# Allegro board max86141_spo2_1mm_apps_p3.brd
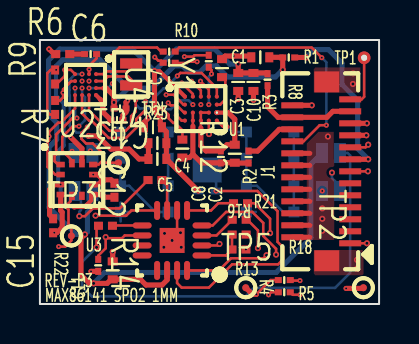
[diagram p0: board, top side]
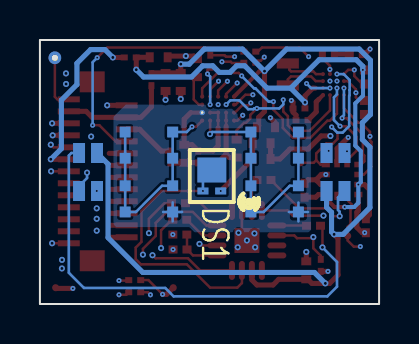
[diagram p1: board, bottom side, seen from below]

Outline 16.99 x 13.21 mm; copper layers: TOP, L02_GND, L03_SIG, BOTTOM. Coordinates in mm from the lower left corner of the outline.
Outline path: rectangle 0,0 16.99,13.21

## Design rules (mm)
constraint set DEFAULT: min track width 0.127

## Placement (name value [footprint] x y rotation side)
C1  22UF  [0402]  11.04 12.34 0 top
C2  22UF  [0402]  9.76 7.52 270 top
C3  22UF  [0402]  9.94 11.11 90 top
C4  22UF  [0402]  5.89 7.26 0 top
C5  22UF  [0402]  5.89 8.05 0 top
C6  1UF  [CAPC0603X33M]  2.54 12.5 0 top
C7  10UF  [0402]  9.13 11.8 270 top
C8  1UF  [CAPC0603X33M]  9.06 7.36 270 top
C9  1UF  [CAPC0603X33M]  3.86 9.2 180 top
C10  22UF  [0402]  10.7 11.11 90 top
C11  22UF  [0402]  3.65 1.68 270 top
C12  0.1UF  [CAPC0603X33M#2]  3.73 5.69 270 top
C13  1UF  [CAPC0603X33M]  4.01 9.78 180 top
C15  0.1UF  [CAPC0603X33M#2]  0.66 3.91 90 top
DS1  CT DBLP31.12-5C8C-56-J6Q6  [OSRM_CT-DBLP31_12-1]  8.38 6.4 0 bottom
DS2  SFH 7013  [LED_SFH7013]  2.18 6.6 180 bottom
DS3  SFH 7013  [LED_SFH7013]  14.58 6.6 0 bottom
J1  5016162575  [MOLEX_501616-2575]  14.05 6.64 90 top
NOREF  -  []  12.7 -12.7 0 top
NOREF#2  -  []  8.38 64.01 0 top
NOREF#3  -  []  184.71 31.64 0 top
NOREF#4  -  []  0 0 90 top
NOREF#5  -  []  0 13.21 0 top
PD1  VEMD8080  [EK_DIO_VEMD8080]  11.53 6.6 0 bottom
PD2  VEMD8080  [EK_DIO_VEMD8080]  5.23 6.6 0 bottom
R1  0  [RESC0603X33M#2]  12.47 12.33 0 top
R2  0  [RESC0603X33M#2]  10.46 7.35 270 top
R3  0  [RESC0603X33M#2]  11.41 11.22 90 top
R4  0  [RESC0603X33M#2]  12.24 1.2 0 top
R5  0  [RESC0603X33M#2]  12.24 0.59 0 top
R6  10  [RESC0603X33M]  1.14 12.5 0 top
R7  3.3K  [RESC0603X33M]  0.76 9.83 270 top
R8  OPEN  [RESC0603X23L]  8.46 12.14 270 top
R9  3.3K  [RESC0603X33M]  0.76 11.36 90 top
R10  0  [RESC0603X33M#2]  6.48 12.07 0 top
R11  0  [RESC0603X33M#2]  6.48 12.63 180 top
R12  100K  [RESC1005X50L]  7.14 7.78 270 top
R13  0  [RESC0603X33M]  9.98 3.47 180 top
R14  OPEN  [RESC0603X23L]  2.92 1.93 270 top
R16  0  [RESC0603X33M]  9.98 4.22 180 top
R17  0  [RESC0603X33M]  5.77 6.2 0 top
R18  0  [RESC0603X33M]  9.97 2.73 180 top
R21  0  [RESC0603X33M]  10.05 5.04 180 top
R22  0  [RESC0603X33M]  3.28 3.92 0 top
R23  100K  [RESC1005X50L]  5.66 8.84 0 top
S1  -  [INTENTIONAL_SHORT_2PIN]  8.86 9.57 180 bottom
TP1  N/A  [TP_C25H12]  16.24 12.32 0 top
TP2  TP14PAD  [TP_CIR_0-3556]  16.21 0.82 0 top
TP3  TP14PAD  [TP_CIR_0-3556]  1.57 3.41 0 top
TP4  TP14PAD  [TP_CIR_0-3556]  3.94 7.06 0 top
TP5  TP14PAD  [TP_CIR_0-3556]  10.31 0.82 0 top
U1  MAX86141  [BGA20C40P5X4_204X184X50B27M]  8.06 9.77 0 top
U2  KX122-1037  [KNX_LGA12P]  1.85 6.23 0 top
U3  MAX4740ETE+  [QFN50P300X300X80-17M]  6.62 3.18 180 top
U4  MAX32664GWEZ+  [MAXIM_21-100241]  2.29 10.98 270 top
Y1  32.7680KHZ  [XTALDFN160X100X50-2M]  4.57 11.48 270 top

## Library data of the parts
C1-C5 C10 C11 = CAP_NP: alternate symbols: 0402_NOSILK,CAPC1005X50L,CAP0402-NOT_FOR_TEST; part number: CAP_NP_0402CAP-0402,22UF,20-0022U-BA80
C6 C9 C13 = CAP_NP: alternate symbols: 0201_NOSILK,CAPC0603X23L,CAP0201-NOT_FOR_TEST; part number: CAP_NP_0201CAPM-CAPC0603X33M,1UF,20-0001U-EA78
C7 = CAP_NP: alternate symbols: 0402_NOSILK,CAPC1005X50L,CAP0402-NOT_FOR_TEST; part number: CAP_NP_0402CAP-0402,10UF,20-0010U-BA12
C8 = CAP_NP: alternate symbols: 0201_NOSILK,CAPC0603X23L,CAP0201-NOT_FOR_TEST; part number: CAP_NP_0201CAPM-CAPC0603X33M,1UF,20-0001U-AA20
C12 C15 = CAP_NP: alternate symbols: 0201_NOSILK,CAPC0603X23L,CAPC0603X33M_NOSILK_RF; part number: CAP_NP_0201CAPM-CAPC0603X33M,0.1UF,20-000U1-BA99
DS1 = LED_3P: part number: LED_3P_LED_CT-DBLP31_12-OSRM_CT-DBLP31_12-1,CT DBLP31.12-5C8C-56-J6Q6,30-CTDBLP31125C8C56J6Q6-00
DS2 DS3 = LED_4P: part number: LED_4P_SFH7013-LED_SFH7013,SFH 7013,30-SFH7013-00
J1 = 501616-2575: part number: 501616-2575_RA-MOLEX_501616-2575,5016162575,01-501616257525P-29
PD1 PD2 = EK_DIO_PIN_8P: part number: EK_DIO_PIN_8P_SMD-EK_DIO_VEMD8080,VEMD8080,N/A
R1-R5 R10 R11 R13 R16-R18 R21 R22 = RES: alternate symbols: 0201_NOSILK,RESC0603X23L; part number: RES_0201RES-RESC0603X33M,0,80-0000R-95
R6 = RES: alternate symbols: (0201_NOSILK); part number: RES_0201RES-RESC0603X33M,10,80-0010R-95
R7 R9 = RES: alternate symbols: (0201_NOSILK); part number: RES_0201RES-RESC0603X33M,3.3K,80-003K3-95
R8 R14 = EK_RES_SMD: part number: EK_RES_SMD_0201_FF-RESC0603X23L,OPEN,N/A
R12 R23 = EK_RES_SMD: part number: EK_RES_SMD_0402_FF-RESC1005X50L,100K,80-0100K-23
S1 = INTENTIONAL_SHORTS: alternate symbols: INTENTIONAL_SHORT_2PIN_C170H110;INTENTIONAL_SHORT_2PIN_C0508H0203;INTENTIONAL_SHORT_2PIN_C0635H03048;INTENTIONAL_SHORT_2PIN_MB_START_LAYER;INTENTIONAL_SHORT_2PIN_C0635H03048_M0;INTENTIONAL_SHORT_2PIN_C0508H0203_M0;INTENTIONAL_SHORT_2PIN_V16H6; part number: INTENTIONAL_SHORTS_PAD_2-INTENTIONAL_SHORT_2PIN,INTENTIONAL_SHORT_2PIN,N/A
TP1 = TP: part number: TP_TP-TP_C25H12,N/A,N/A
TP2-TP5 = EVKIT_TP: part number: EVKIT_TP_EVKIT_TP-TP_CIR_0-3556,TP14PAD,N/A
U1 = EK_MAX86141: alternate symbols: BGA20C40P5X4_204X184X50B27L; part number: EK_MAX86141_WLP-20-BGA20C40P5X4_204X184X50B27M,MAX86141,N/A
U2 = KX122-1037: part number: KX122-1037_LGA12-KNX_LGA12P,KX122-1037,10-KX1221037-L
U3 = MAX4740: part number: MAX4740_TQFN16-EP-QFN50P300X300X80-17M,MAX4740ETE+,10-MAX4740ETE-T
U4 = EK_MAX32664: alternate symbols: BGA16C35P4X4_157X155X69L; part number: EK_MAX32664_WLP16_VER_B-C-MAXIM_21-100241,MAX32664GWEZ+,N/A
Y1 = XTAL: part number: XTAL_XTALDFN160X100X50-2M-XTALDFN160X100X50-2M,32.7680KHZ,60-32K76-0ET

## Footprints (pads in the part's own frame, mm; a bottom-side part is the same pattern mirrored in y, then rotated)
0402
  rect 0.4x0.5 smd: 1(-0.45,0) 2(0.45,0)
BGA20C40P5X4_204X184X50B27M
  round 0.21 smd: A1(-0.8,0.6) A2(-0.4,0.6) A3(0,0.6) A4(0.4,0.6) A5(0.8,0.6) B1(-0.8,0.2) B2(-0.4,0.2) B3(0,0.2) B4(0.4,0.2) B5(0.8,0.2) C1(-0.8,-0.2) C2(-0.4,-0.2) C3(0,-0.2) C4(0.4,-0.2) C5(0.8,-0.2) D1(-0.8,-0.6) D2(-0.4,-0.6) D3(0,-0.6) D4(0.4,-0.6) D5(0.8,-0.6)
CAPC0603X33M
  rect 0.35x0.3 smd: 1(-0.3,0) 2(0.3,0)
CAPC0603X33M#2
  rect 0.45x0.4 smd: 1(-0.35,0) 2(0.35,0)
EK_DIO_VEMD8080
  rect 0.55x0.54 smd: 1(-1.19,-2) 2(-1.19,-0.69) 3(-1.19,0.69) 4(-1.19,2) 5(1.19,2) 6(1.19,0.69) 7(1.19,-0.69) 8(1.19,-2)
INTENTIONAL_SHORT_2PIN
  round 0.254 hole 0.102: 1(0,0) 2(0,0)
KNX_LGA12P
  rect 0.41x0.28 smd: 1(-0.815,0.75) 2(-0.815,0.25) 3(-0.815,-0.25) 4(-0.815,-0.75) 7(0.815,-0.75) 8(0.815,-0.25) 9(0.815,0.25) 10(0.815,0.75)
  rect 0.28x0.41 smd: 5(-0.25,-0.815) 6(0.25,-0.815) 11(0.25,0.815) 12(-0.25,0.815)
LED_SFH7013
  rect 0.6x1 smd: 1(-0.45,0.95) 2(0.45,0.95) 3(-0.45,-0.95) 4(0.45,-0.95)
MAXIM_21-100241
  round 0.2 smd: A1(-0.525,0.525) A2(-0.175,0.525) A3(0.175,0.525) A4(0.525,0.525) B1(-0.525,0.175) B2(-0.175,0.175) B3(0.175,0.175) B4(0.525,0.175) C1(-0.525,-0.175) C2(-0.175,-0.175) C3(0.175,-0.175) C4(0.525,-0.175) D1(-0.525,-0.525) D2(-0.175,-0.525) D3(0.175,-0.525) D4(0.525,-0.525)
MOLEX_501616-2575
  rect 0.3x1.1 smd: 1(-3.6,-1.5) 2(-3.3,1.4) 3(-3,-1.5) 4(-2.7,1.4) 5(-2.4,-1.5) 6(-2.1,1.4) 7(-1.8,-1.5) 8(-1.5,1.4) 9(-1.2,-1.5) 10(-0.9,1.4) 11(-0.6,-1.5) 12(-0.3,1.4) 13(0,-1.5) 14(0.3,1.4) 15(0.6,-1.5) 16(0.9,1.4) 17(1.2,-1.5) 18(1.5,1.4) 19(1.8,-1.5) 20(2.1,1.4) 21(2.4,-1.5) 22(2.7,1.4) 23(3,-1.5) 24(3.3,1.4) 25(3.6,-1.5)
  rect 1.05x1.25 smd: 26(-4.475,-0.325) 27(4.475,-0.325)
OSRM_CT-DBLP31_12-1
  rect 0.55x0.35 smd: 1(-0.448,0.75) 2(0.443,0.75)
  rect 1.45x1.25 smd: 3(-0.002,-0.3)
QFN50P300X300X80-17M
  oval 0.95x0.3 smd: 1(-1.5,0.75) 2(-1.5,0.25) 3(-1.5,-0.25) 4(-1.5,-0.75) 9(1.5,-0.75) 10(1.5,-0.25) 11(1.5,0.25) 12(1.5,0.75)
  oval 0.3x0.95 smd: 5(-0.75,-1.5) 6(-0.25,-1.5) 7(0.25,-1.5) 8(0.75,-1.5) 13(0.75,1.5) 14(0.25,1.5) 15(-0.25,1.5) 16(-0.75,1.5)
  rect 1.25x1.25 smd: 17(0,0)
RESC0603X23L
  rect 0.35x0.3 smd: 1(-0.3,0) 2(0.3,0)
RESC0603X33M
  rect 0.45x0.4 smd: 1(-0.35,0) 2(0.35,0)
RESC0603X33M#2
  rect 0.35x0.3 smd: 1(-0.3,0) 2(0.3,0)
RESC1005X50L
  rect 0.4x0.5 smd: 1(-0.45,0) 2(0.45,0)
TP_C25H12
  round 0.635 hole 0.305: 1(0,0)
TP_CIR_0-3556
  round 0.356 smd: 1(0,0)
XTALDFN160X100X50-2M
  rect 0.51x1.11 smd: 1(-0.55,0) 2(0.55,0)

## Nets
1V8_A: C1.2 C12.2 C13.2 C15.2 R1.1 R7.2 R9.2 U2.3 U2.7(VDD) U4.A3
1V8_O: C2.2 C8.2 R2.2 R12.2 U1.C2 U1.D2
GND_SIGNAL: C1.1 C2.1 C3.1 C4.1 C5.1 C7.1 C8.1 C9.1 C10.1 C11.1 C12.1 C13.1 C15.1 J1.2 J1.4 J1.6 J1.8 J1.10 J1.12 J1.14 J1.16 J1.19 J1.21 J1.24 J1.26 J1.27 R6.1 R14.2 S1.2 U1.C3 U1.C4 U1.D3 U2.4 U2.8 U2.9 U2.11 U3.6 U3.17 U4.B2
ACC_INT: R8.1 TP3.1(TP1) U2.5 U4.B3
GPIO1: R14.1 R23.1 U1.B3 U3.2 U3.10
I2C0_SCK: R9.1 R11.2 U4.D1
I2C0_SDA: R7.1 R10.1 U4.D2
LED1: DS1.2 DS1.3(K2) U3.15
LED1_DRV: U1.D1 U3.16
LED2: R16.2 U3.3
LED2_DRV: U1.C1 U3.4
LED3: R17.2 U3.7
LED3_DRV: U1.B1 U3.8
LED4: R13.2 R18.2 U3.1
LED5: R21.2 U3.5
LED6: R22.2 U3.9
MFIO: R4.1 TP5.1(TP1) U4.C2
PD1_IN: PD1.1 PD1.2 PD1.3 PD1.5(K_7) PD1.6 PD1.7 PD1.8 U1.D5
PD2_IN: PD2.1 PD2.2 PD2.3 PD2.5(K_7) PD2.6 PD2.7 PD2.8 U1.D4
PD_GND: PD1.4 PD2.4 S1.1 U1.C5
PPG_INT: R12.1 U1.B2 U4.B4
RESET: C6.2 R5.1 TP2.1(TP1) U4.B1
SPI0_ACC_CS: TP4.1(TP1) U2.10 U4.C1
SPI0_MISO: U1.A3 U2.1 U4.D3
SPI0_MOSI: U1.A4 U2.2 U4.D4
SPI0_PPG_CS: U1.A5 U4.C4
SPI0_SCLK: U1.A2 U2.12 U4.C3
UNNAMED_1_501616-2575_I145_1: J1.1 R5.2
UNNAMED_1_501616-2575_I145_13: J1.13 R4.2
UNNAMED_1_501616-2575_I145_15: J1.15 R1.2
UNNAMED_1_501616-2575_I145_17: J1.17 R10.2
UNNAMED_1_501616-2575_I145_18: J1.18 R11.1
UNNAMED_1_501616-2575_I145_20: J1.20 R2.1
UNNAMED_1_501616-2575_I145_22: J1.22 J1.23 R3.1
UNNAMED_1_501616-2575_I145_25: J1.25 TP1.1(TP1)
UNNAMED_1_CAPNP_I107_2: C7.2 U1.B5
UNNAMED_1_CAPNP_I210_2: C9.2 U4.A4
UNNAMED_1_CAPNP_I217_1: C6.1 R6.2
UNNAMED_1_EKMAX32664_I236_A1B: U4.A1 Y1.1
UNNAMED_1_EKMAX32664_I236_A2: U4.A2 Y1.2
UNNAMED_1_EKMAX86141_I179_GPIO2: R8.2 U1.B4
UNNAMED_1_LED4P_I189_K1: DS3.1 R18.1
UNNAMED_1_LED4P_I189_K2: DS3.2 R21.1
UNNAMED_1_LED4P_I189_K3: DS3.4(K3) R22.1
UNNAMED_1_LED4P_I190_K1: DS2.1 R13.1
UNNAMED_1_LED4P_I190_K2: DS2.2 R16.1
UNNAMED_1_LED4P_I190_K3: DS2.4(K3) R17.1
VLED+: C3.2 C4.2 C5.2 C10.2 C11.2 DS1.1 DS2.3 DS3.3 R3.2 R23.2 U1.A1(VLED1) U3.14(VCC)

Pads without a net: J1 3 5 7 9 11; U2 6; U3 11 12 13

## Via types
v1: diameter 0.254, hole 0.102, TOP to BOTTOM, 58 vias
v2: diameter 0.305, hole 0.152, TOP to BOTTOM, 43 vias

## Routing (per net, layer and track width the routed paths; a pad name or vN(x,y) marks a point on that pad's centre or on a via; arc(x,y) is an arc through that point)
1V8_A: length 32.6
  TOP w0.127: R7.2 0.5,9.48 0.37,9.61 0.37,11.55 0.53,11.71 R9.2 ; 3.2,10.8 2.81,10.8 U4.A3
  TOP w0.203: U2.7 2.57,5.37 2.57,5.18 2.23,4.85 v1(1.72,4.85)
  TOP w0.254: U2.7 3.04,5.48 3.17,5.34 C12.2 ; C13.2 3.71,10.06 3.71,10.06 v2(3.71,10.08) 3.71,10.41 3.32,10.8 3.2,10.8 ; v1(1.04,5.98) 0.74,5.98 0.48,5.72 0.48,4.46 C15.2 ; C1.2 12.16,12.34 R1.1 v2(12.17,11.72)
  BOTTOM w0.203: v1(0.81,11.71) 0.8,11.7 0.8,10.42 1.19,10.03 1.19,7.93 0.91,7.65 0.91,6.1 v1(1.04,5.98) 1.04,5.06 1.25,4.85 v1(1.72,4.85)
  BOTTOM w0.254: 4.42,10.8 v2(3.71,10.08) ; 4.42,10.8 3,12.22 1.14,12.22 0.81,11.89 v1(0.81,11.71) ; 4.42,10.8 5.61,10.8 6.73,11.92 7.14,11.92 7.47,11.59 8,11.59 8.33,11.92 8.84,11.92 9.4,11.36 11.8,11.36 v2(12.17,11.72)
1V8_O: length 5.7
  TOP w0.127: U1.C2 U1.D2 7.66,8.89
  TOP w0.254: 7.66,7.49 7.5,7.33 R12.2 ; 7.66,7.49 7.66,8.89 ; 7.66,7.49 8.1,7.06 C8.2 9.07,7.07 C2.2 9.78,7.05 R2.2
GND_SIGNAL: length 31.7
  TOP w0.127: U3.6 6.87,3.74 v2(7.04,3.57) ; 8.06,8.81 U1.D3 U1.C3 U1.C4
  TOP w0.203: 9.43,9.57 S1.2
  TOP w0.254: J1.16 13.52,7.54 ; J1.14 13.52,6.94 ; C7.1 9.28,12.4 v2(9.68,12.4) 10.53,12.4 C1.1 ; v1(2.67,6.48) 2.9,6.48 3.16,6.21 ; J1.10 13.52,5.74 ; C10.1 v2(10.7,10.21) ; J1.2 13.52,3.34 ; U2.11 2.1,7.78 v1(1.55,8.33) ; 9.43,9.57 9.76,9.25 C2.1 9.37,7.97 C8.1 8.32,7.66 8.06,7.91 8.06,8.81 ; J1.21 v2(16.38,9.04) ; 3.16,6.21 3.56,6.21 C12.1 ; 3.16,6.21 2.92,5.98 U2.8 ; J1.6 13.52,4.54 ; R6.1 0.71,12.5 0.46,12.75 v1(0.45,12.75) ; v1(0.72,3.57) 0.85,3.57 1.11,3.84 1.11,4.6 1.04,4.67 U2.4 ; C9.1 4.16,9.45 4.31,9.6 C13.1 4.31,10.1 v1(4.4,10.18) ; J1.8 13.52,5.14 ; v2(2.44,8.41) 2.9,8.41 3.56,7.75 4.47,7.75 4.97,7.26 C4.1 C5.1 ; J1.19 v2(16.35,8.44) ; v2(3.65,2.61) 3.65,2.6 C11.1 ; C3.1 v2(9.94,10.26) ; J1.4 13.52,3.94 ; J1.12 13.52,6.34 ; J1.24 v2(13.62,9.94) ; R14.2 v1(2.56,1.63)
  vias: v1(2.46,11.15) v2(6.21,2.84) v2(6.24,3.53) v2(6.62,3.18) v2(7.08,2.84) v2(14.15,4.79) v2(14.15,4.26) v2(14.15,3.67) v2(14.43,8.38) v2(15.69,11.54) v2(15.68,11.01) v2(15.89,2.21) v2(15.89,1.78)
ACC_INT: length 18.9
  TOP w0.127: U2.5 1.53,5.33 1.53,5.14 1.37,4.98 1.37,4.79 1.43,4.73 1.43,4.01 1.57,3.86 TP3.1 1.57,3.18 1.27,2.87 v1(0.94,2.87) ; v1(7.24,12.37) 7.67,12.37 7.74,12.44 R8.1
  L03_SIG w0.127: v1(3.63,11.03) 4.62,12.02 6.88,12.02 v1(7.24,12.37) ; v1(0.94,2.87) 1.09,3.03 1.09,3.66 0.72,4.03 0.72,7.68 1.14,8.11 1.14,9.6 1.98,10.44 2.26,10.44 2.46,10.65 v1(2.46,10.8)
  BOTTOM w0.127: v1(3.63,11.03) 3.41,10.8 v1(2.46,10.8)
GPIO1: length 23
  TOP w0.127: v2(9,3.01) 8.92,2.93 U3.2 ; R14.1 2.92,2.42 3.29,2.79 v2(3.29,3.35) 3.35,3.29 4.11,3.29 4.25,3.43 U3.10
  TOP w0.254: R23.1 5.21,9.08 v1(5.45,9.32)
  L03_SIG w0.127: v2(9,3.01) 7.74,3.01 7.22,2.5 6.35,2.5 6.35,2.49 6.07,2.49 5.27,3.29 3.35,3.29 v2(3.29,3.35) 3.13,3.51 3.13,9.17 3.42,9.46 5.19,9.46 5.33,9.32 v1(5.45,9.32) 6.51,9.32 6.7,9.12 6.96,9.12 7.15,9.31 7.15,9.91 7.53,10.29 7.75,10.29 v1(8.06,9.97)
I2C0_SCK: length 7.2
  TOP w0.127: R11.2 6.07,12.63 5.87,12.83 3.99,12.83 v1(3.53,12.37) ; U4.D1 1.55,11.71 v1(1.24,11.71) 1.24,11.4 0.84,11.01 R9.1
  L03_SIG w0.127: v1(1.24,11.71) 1.24,11.96 1.65,12.37 v1(3.53,12.37)
I2C0_SDA: length 7.8
  TOP w0.127: R10.1 6.08,12.17 5.93,12.17 v1(5.75,12.35) ; R7.1 1.01,10.18 1.16,10.33 v1(1.16,10.57) 1.16,10.74 1.57,11.15 U4.D2
  L03_SIG w0.127: v1(1.16,10.57) 1.16,11.15 2.07,12.06 3.98,12.06 4.27,12.35 v1(5.75,12.35)
LED1: length 13.9
  TOP w0.127: U3.15 6.87,1.05 7.1,0.82 8.47,0.82 9.63,1.98 11.93,1.98 12.2,2.25 12.2,2.82 11.91,3.11 11.91,4.64 10.89,5.65 v1(8.82,5.65)
  BOTTOM w0.127: v1(8.82,5.65) 8.82,6.26 DS1.3
LED1_DRV: length 24
  TOP w0.127: U3.16 8.97,1.68 9.58,2.29 11.2,2.29 v2(11.35,2.44) ; U1.D1 7.1,9.17 v1(6.83,9.44)
  L03_SIG w0.127: v1(6.83,9.44) 6.85,9.45 6.85,9.97 7.43,10.55 9,10.55 9.05,10.6 13.45,10.6 15.14,8.91 15.14,5.5 14.5,4.86 14.5,3.52 13.8,2.81 11.52,2.81 11.35,2.64 v2(11.35,2.44)
LED2: length 1.8
  TOP w0.127: U3.3 8.85,3.43 R16.2
LED2_DRV: length 25.7
  TOP w0.127: v1(6.43,10.06) 6.55,9.94 6.86,9.94 7.22,9.57 U1.C1 ; U3.4 8.65,3.93 9.33,4.61 10.64,4.61 11.19,4.06 11.19,3.4 11.83,2.76 v2(11.83,2.47)
  L03_SIG w0.127: v1(6.43,10.06) 7.1,10.74 7.24,10.74 7.3,10.8 8.89,10.8 8.95,10.85 13.55,10.85 15.43,8.97 15.43,5.43 14.75,4.76 14.75,3.41 13.82,2.47 v2(11.83,2.47)
LED3: length 1.6
  TOP w0.127: R17.2 6.37,5.94 U3.7
LED3_DRV: length 13.6
  TOP w0.127: U3.8 4.58,4.68 4.32,4.42 v2(2.79,4.42) ; U1.B1 7.19,9.97 6.7,10.47 v1(6.32,10.47)
  L03_SIG w0.127: v2(2.79,4.42) 2.79,5.24 2.35,5.68 2.35,6.9 2.84,7.39 2.84,9.35 3.24,9.74 3.85,9.74 3.92,9.81 5.66,9.81 v1(6.32,10.47)
LED4: length 2.4
  TOP w0.127: R13.2 9.62,3.47 R18.2 9.33,2.43 U3.1
LED5: length 2.5
  TOP w0.127: U3.5 8.57,4.68 8.93,5.04 R21.2
LED6: length 1.5
  TOP w0.127: U3.9 3.65,3.93 R22.2
MFIO: length 23.3
  TOP w0.127: R4.1 11.56,1.2 v1(10.85,0.49)
  TOP w0.254: TP5.1 10.64,0.49 v1(10.85,0.49)
  L03_SIG w0.127: v1(10.85,0.49) 10.57,0.49 10.46,0.38 2.03,0.38 0.37,2.05 0.37,7.81 0.77,8.22 0.77,9.72 1.48,10.43 1.48,10.92 1.72,11.15 v1(2.11,11.15)
PD1_IN: length 11.3
  TOP w0.127: U1.D5 9.17,8.86 v1(9.38,8.86)
  BOTTOM w0.127: v1(9.38,8.86) 9.64,8.6 PD1.1 PD1.2 PD1.3 10.87,5.91 12.18,4.6 PD1.5 PD1.6 PD1.7 PD1.8
PD2_IN: length 12.4
  TOP w0.127: U1.D4 8.46,8.51 v2(8.47,8.5)
  BOTTOM w0.127: v2(8.47,8.5) 8.37,8.6 PD2.8 PD2.7 PD2.6 PD2.5 5.78,4.6 4.47,5.91 PD2.3 PD2.2 PD2.1
PD_GND: length 3.8
  BOTTOM w0.127: 10.34,4.13 PD1.4 ; PD1.4 10.34,5.08 ; PD1.4 10.82,4.6 ; PD1.4 9.86,4.6 ; 4.04,4.13 PD2.4 ; PD2.4 4.52,4.6 ; PD2.4 4.04,5.08 ; PD2.4 3.56,4.6
PPG_INT: length 10.3
  TOP w0.127: v1(6.12,9.78) 6.45,9.46 6.45,9.28 6.68,9.06 6.77,9.06 7.14,8.69 R12.1 ; v1(4.8,10.21) 4.8,9.63 4.57,9.4 4.57,8.94 4.29,8.66 3.48,8.66 2.46,9.68 U4.B4
  BOTTOM w0.127: v1(4.8,10.21) 4.8,9.99 5,9.78 v1(6.12,9.78) 6.25,9.78 6.29,9.74 6.56,9.74 7,10.19 7.45,10.19 v1(7.66,9.97)
RESET: length 29.2
  TOP w0.127: R5.1 11.58,0.59 v1(11.46,0.46) ; U4.B1 2.46,11.74 v1(2.46,11.74) 2.46,11.92 2.84,12.29 C6.2
  TOP w0.254: v1(15.34,0.78) 16.17,0.78 TP2.1
  L03_SIG w0.127: v1(15.34,0.78) 12.87,0.78 12.55,0.46 v1(11.46,0.46) 11.11,0.8 2.95,0.8 2.83,0.69 2.55,0.69 1.4,1.84 1.4,3.86 1.04,4.22 1.04,5.24 1.36,5.55 1.36,6.52 1.12,6.76 1.12,7.6 1.48,7.96 1.63,7.96 1.9,8.23 1.9,8.49 1.5,8.9 1.5,9.43 2.24,10.16 2.41,10.16 2.97,10.72 2.97,11.43 2.67,11.74 v1(2.46,11.74)
SPI0_ACC_CS: length 8
  TOP w0.127: v1(2.37,8.86) 2.08,8.56 2.08,8.26 2.31,8.03 2.65,8.03 3.15,7.53 3.15,7.19 ; 3.15,7.19 2.93,6.98 U2.10 ; 3.15,7.19 3.27,7.07 3.94,7.07 TP4.1
  BOTTOM w0.127: v1(2.37,8.86) 2.1,8.58 1.82,8.58 1.5,8.9 1.5,10.42 1.48,10.44 1.48,10.7 1.47,10.71 1.47,11.2 1.77,11.5 v1(2.11,11.5)
SPI0_MISO: length 12.6
  TOP w0.127: U1.A3 8.06,10.68 v1(7.6,11.14) ; U2.1 0.9,6.98 0.74,7.14 0.74,7.42 0.81,7.5 0.81,8.48 1.63,9.3 v1(1.85,9.3)
  L03_SIG w0.127: v1(7.6,11.14) 7.02,11.73 6.39,11.73 5.77,11.1 4.29,11.1 3.89,10.7 3.4,10.7 2.61,9.91 2.46,9.91 v1(1.85,9.3)
  BOTTOM w0.127: v1(1.76,10.8) 1.76,9.44 1.85,9.35 v1(1.85,9.3)
SPI0_MOSI: length 18.9
  TOP w0.127: v1(8.04,11.15) 8.46,10.73 U1.A4 ; U2.2 0.77,6.48 0.38,6.86 0.38,8.11 0.46,8.19 v1(0.46,8.39) 0.46,8.61 0.91,9.07 1.04,9.07 1.76,9.79 U4.D4
  L03_SIG w0.127: v1(8.04,11.15) 7.56,11.63 7.56,12.56 7.32,12.8 1.22,12.8 0.38,11.97 0.38,8.77 0.46,8.69 v1(0.46,8.39)
SPI0_PPG_CS: length 10.8
  TOP w0.127: U4.C4 2.11,9.53 2.46,9.17 2.58,9.17 3.45,8.31 4.32,8.31 4.82,8.81 4.82,9.25 5.3,9.72 v1(5.3,10.13) ; U1.A5 8.86,10.79 8.09,11.56 7.04,11.56 v1(6.88,11.41)
  BOTTOM w0.127: v1(6.88,11.41) 6.26,10.79 6.19,10.79 5.53,10.13 v1(5.3,10.13)
SPI0_SCLK: length 11.6
  TOP w0.127: v1(7.11,11.06) 7.11,11.06 7.66,10.5 U1.A2 ; U2.12 1.6,7.19 1.12,7.67 1.12,8.36 1.65,8.89 v1(1.96,8.89)
  L03_SIG w0.127: v1(1.96,8.89) 3.49,10.43 4.15,10.43 4.42,10.7 5.82,10.7 6.18,11.06 v1(7.11,11.06)
  BOTTOM w0.127: v1(2.11,10.8) 2.11,10.49 2.26,10.34 2.26,9.2 v1(1.96,8.89)
UNNAMED_1_501616-2575_I145_1: length 7.1
  TOP w0.127: J1.1 v2(16.38,3.04) ; R5.2 12.67,0.46 v1(13.03,0.46)
  L03_SIG w0.127: v1(13.03,0.46) 15.75,0.46 16.61,1.32 16.61,2.81 v2(16.38,3.04)
UNNAMED_1_501616-2575_I145_13: length 10.2
  TOP w0.127: J1.13 v2(16.43,6.64) ; v1(13.03,1.17) 12.57,1.17 R4.2
  L03_SIG w0.127: v2(16.43,6.64) 16.43,3.79 15.95,3.31 15.95,2.77 16.33,2.39 16.33,1.63 15.88,1.17 v1(13.03,1.17)
UNNAMED_1_501616-2575_I145_15: length 9.1
  TOP w0.254: J1.15 v2(16.45,7.24) ; R1.2 v2(13.34,12.33)
  BOTTOM w0.254: v2(16.45,7.24) 15.92,7.77 15.92,10.2 15.14,10.98 15.14,12.04 14.45,12.73 13.73,12.73 v2(13.34,12.33)
UNNAMED_1_501616-2575_I145_17: length 15.1
  TOP w0.127: R10.2 6.83,12.07 6.85,12.06 7.37,12.06 7.43,12.12 v1(7.87,12.12) ; J1.17 16.32,7.84 v2(16.45,7.97)
  L03_SIG w0.127: v1(7.87,12.12) 8.59,12.83 14.88,12.83 16.15,11.55 16.15,9.48 16.01,9.33 16.01,8.2 16.24,7.97 v2(16.45,7.97)
UNNAMED_1_501616-2575_I145_18: length 13.2
  TOP w0.127: v1(14.35,8.94) 14.02,8.94 13.21,8.14 J1.18 ; v1(14.12,12.32) 13.61,12.83 6.98,12.83 R11.1
  BOTTOM w0.127: v1(14.12,12.32) 14.35,12.09 v1(14.35,8.94)
UNNAMED_1_501616-2575_I145_20: length 2.6
  TOP w0.254: R2.1 10.9,7.65 11.99,8.74 J1.20
UNNAMED_1_501616-2575_I145_22: length 5.5
  TOP w0.254: R3.1 11.41,9.87 11.93,9.34 J1.22 14.38,9.34 14.68,9.64 J1.23
UNNAMED_1_501616-2575_I145_25: length 2.7
  TOP w0.127: TP1.1 16.24,10.37 16.12,10.24 J1.25
UNNAMED_1_CAPNP_I107_2: length 1.7
  TOP w0.127: C7.2 9.29,11.19 9.29,10.23 9.03,9.97 U1.B5
UNNAMED_1_CAPNP_I210_2: length 1.6
  TOP w0.203: U4.A4 3.02,10.24
  TOP w0.254: 3.02,10.24 3.15,10.11 3.15,9.61 C9.2
UNNAMED_1_CAPNP_I217_1: length 0.7
  TOP w0.254: C6.1 R6.2
UNNAMED_1_EKMAX32664_I236_A1B: length 2.1
  TOP w0.127: Y1.1 4.5,11.96 4.5,11.72 4.41,11.64 3.3,11.64 3.16,11.5 U4.A1
UNNAMED_1_EKMAX32664_I236_A2: length 2.2
  TOP w0.127: Y1.2 4.57,11.23 4.42,11.38 3.4,11.38 3.17,11.15 U4.A2
UNNAMED_1_EKMAX86141_I179_GPIO2: length 2
  TOP w0.127: v1(8.6,11.51) 8.6,11.71 R8.2
  BOTTOM w0.127: v1(8.6,11.51) 8.46,11.38 v1(8.46,9.97)
UNNAMED_1_LED4P_I189_K1: length 6.2
  L03_SIG w0.127: v1(14.14,5.66) 13.8,5.32 13.8,3.4 13.47,3.07 11.31,3.07 11.24,3.14 10.74,3.14 v1(10.32,2.73)
UNNAMED_1_LED4P_I189_K2: length 8.6
  TOP w0.127: v2(11.53,3.55) 11.53,4.26 10.75,5.04 R21.1
  L03_SIG w0.127: v2(11.53,3.55) 13.25,3.55 13.55,3.85 13.55,5.51 14.61,6.57 v2(14.63,6.57)
  BOTTOM w0.127: DS3.2 15.03,5.9 14.63,6.3 v2(14.63,6.57)
UNNAMED_1_LED4P_I189_K3: length 23.9
  TOP w0.127: v2(2.84,2.83) 2.84,3.82 R22.1
  BOTTOM w0.127: v2(2.84,2.83) 2.11,2.1 2.11,0.87 2.59,0.38 10.3,0.38 10.71,0.8 14.78,0.8 15.54,1.56 15.54,7.43 15.42,7.55 DS3.4
UNNAMED_1_LED4P_I190_K1: length 13.5
  L03_SIG w0.127: v1(2.53,7.66) 2.04,7.17 2.04,4.9 2.41,4.52 2.41,4.07 2.6,3.88 2.6,3.56 3.21,2.95 3.79,2.95 4.75,1.98 8.84,1.98 v1(10.33,3.47)
UNNAMED_1_LED4P_I190_K2: length 17.3
  TOP w0.127: R16.1 10.39,4.22 10.92,3.69 v2(10.92,2.8)
  L03_SIG w0.127: v1(1.61,7.64) 1.61,7.03 1.72,6.92 1.72,5.3 1.37,4.96 1.37,4.47 1.75,4.09 1.75,2.92 3.33,1.35 9.47,1.35 v2(10.92,2.8)
  BOTTOM w0.127: DS2.2 1.65,7.64 v1(1.61,7.64)
UNNAMED_1_LED4P_I190_K3: length 5.6
  TOP w0.127: R17.1 4,4.78 2.65,4.78 2.26,4.39 v2(1.98,4.39)
  BOTTOM w0.127: DS2.4 2.06,5.33 2.06,4.7 1.98,4.62 v2(1.98,4.39)
VLED+: length 57.9
  TOP w0.203: v2(5.74,11.65) 5.99,11.65 U1.A1
  TOP w0.254: v2(9.94,12) C3.2 C10.2 11.37,11.56 R3.2 ; v2(2.25,3.48) 2.06,3.29 2.06,1.45 2.48,1.03 v2(2.69,1.03) 3.37,1.03 3.57,1.23 C11.2 5.03,1.23 5.31,0.95 6.12,0.95 6.37,1.21 U3.14 ; v1(7.93,5.65) 6.34,7.25 C4.2 C5.2 6.34,8.62 R23.2 6.03,8.93 6.03,9.34 5.74,9.63 v2(5.74,11.65)
  BOTTOM w0.254: DS2.3 2.63,4.84 2.38,4.59 2.38,3.61 v2(2.25,3.48) 1.8,3.48 0.46,4.83 0.46,7.85 0.84,8.23 0.84,9.07 0.43,9.48 0.43,12.19 0.99,12.75 4.64,12.75 v2(5.74,11.65) 6.85,12.75 8.76,12.75 9.51,12 v2(9.94,12) ; DS3.3 13.58,7 13.58,3.32 11.84,1.58 3.24,1.58 v2(2.69,1.03)

## Copper pours and planes (outline as drawn; the poured copper is in the pictures)
GND_SIGNAL on TOP: 13.37,8.61 13.37,3.2 14.75,3.2 14.75,7.21 14.72,7.24 14.72,8.61
GND_SIGNAL on TOP: 13.72,2.7 13.72,1.52 13.81,1.44 16.15,1.44 16.21,1.51 16.21,2.63 16.15,2.7
GND_SIGNAL on TOP: 13.72,10.57 13.72,11.75 13.81,11.84 16.15,11.84 16.21,11.77 16.21,10.64 16.15,10.57
GND_SIGNAL on L02_GND: 0.31,12.89 0.31,0.31 16.69,0.31 16.69,12.89
PD_GND on BOTTOM: 8.24,9.76 7.36,9.76 6.87,9.27 3.98,9.27 3.98,9.27 3.58,9.27 3.41,9.1 3.41,3.7 3.53,3.59 9.25,3.59 9.51,3.85 13.17,3.85 13.3,3.99 13.3,9.37 12.7,9.97 8.45,9.97
PD_GND on L03_SIG: 8.24,9.76 7.36,9.76 6.87,9.27 3.58,9.27 3.42,9.11 3.42,3.7 3.52,3.59 9.25,3.59 9.5,3.84 11.05,3.84 11.05,3.85 13.16,3.85 13.3,3.99 13.3,9.37 12.7,9.97 8.45,9.97

## Text on the board
Ref Des/Silkscreen Top: REV-P3 | MAX86141 SPO2 1MM
DIMENSION: .200 | 5.1 | .450 | 11.43 | 7.451 | 189.3 | 15.38 | .605 | 16.99 | .669 | 21.39 | .842 | 13.21 | 10.16 | 12.84 | .520 | .400 | .506 | 15.17 | .597 | .201 | 5.11 | 1.026 | 18.32 | 26.05 | .721 | 4.182 | 106.2 | .053 | 1.3 | V-GROOVE | 4 PLACES | R0.060 | 1.5 | DETAIL A | FIDUCIAL | 0.103 | R0.050 | DETAIL B | DETAIL C | 2.6 | 3 PLACES
User.6: at this location | We are accepted duplicate drill | BOTTOM SIDE REQUIRES BLACK SOLDERMASK | NOTES: | FINISH: | TESTING: | MISCELLANEOUS: | TOOLING: | 16.  VENDOR LOGO & DATE CODE REQUIREMENT.  DATE CODE FORMAT MUST BE YYWW ONLY | 17.  FINAL ELECTRICAL TEST TO BE PERFORMED USING PROVIDED IPC-D-356A NETLIST OR ODB++ FORMAT FILE. | 18.  A TIME DOMAIN REFLECTOMETER REPORT FOR EACH IMPEDANCE CONTROLLED LAYER AND A CERTIFICATE | 21.  FINISHED SURFACE CONTACTS AND FILLED VIAS TO BE FREE OF ANY PITS. SCRATCHES PROBE MARKS | 23.  PEMNUT | 22.  THIEVING: | 15.  CHECK ALL THAT APPLY | 14.  CHECK ALL THAT APPLY | 19. IF PRESENT, ALL BLIND/BURIED VIAS WITH AN ASPECT RATIO <1:1 TO BE PLATED SHUT WITH COPPER WHEN | 20.  FOR ALL DRILL INFORMATION REFER TO DRILL CHART. | 13.  DRILL SIZES ARE FINISHED HOLE SIZES. ALL HOLES SHALL BE LOCATED WITHIN .005 DTP. | 9.  ALL TRACES FILLETED OPTION TO ENHANCE RELIABILITY AT PAD JUNCTIONS | 10.  LAYER TO LAYER REGISTRATIONS SHALL BE WITHIN .003 INCHES. | MATERIAL: | 11.  FINISHED COPPER WEIGHT/THICKNESS: | 12.  CHECK ALL THAT APPLY | 1.  DIMENSIONS ARE IN INCHES (EXCEPT WHERE NOTED). | 3.  THE PCB SHALL BE FABRICATED TO IPC-6012, TYPE X, CLASS 2. | 4.  BOARD MATERIAL & CONSTRUCTION SHALL MEET THE REQUIREMENTS OF UL796 | 5.  OVERALL BOARD THICKNESS REFER TO LAMINATION DIAGRAM. TOLERANCE APPLIES | 6.  BOW & TWIST NOT TO EXCEED 0.0075 IN. (0.75%) PER LINEAR INCH. | 7.  PHOTO ETCH CIRCUITRY PER ENCLOSED GERBER RS274X OR ODB++ FORMAT FILE. | 8.  IMPEDANCE REQUIREMENTS: IF NO STACKUP IS DEFINED, THE VENDOR IS ALLOWED TO ADJUST THE DIELECTRIC | 2.  BOARD MATERIAL: | ( )  FINISH CONDUCTOR SURFACES: IMMERSION GOLD, 2-5 MICRO INCHES OVER | (X)  FINISH CONDUCTOR SURFACES: IMMERSION GOLD, 3-8 MICRO INCHES OVER | ( )  FINGERS TO BE GOLD PLATED. | ( )  LEAD FREE AND RoHS COMPLIANT PLATING. | ( )  OTHER ________________________ | ( )  GREEN SOLDERMASK OVER BARE COPPER/BARE GOLD (BOTTOM SIDE ONLY) WITH LIQUID PHOTO IMAGEABLE INK (LPI) | (X)  GREEN TAIYO PSR-4000 | (X)  OTHERS: | (X)  PLACE ON BOTTOM LEGEND LAYER. IF NO BOTTOM LEGEND SUPPLIED, CREATE BOTTOM LEGEND LAYER TO ADD. | ( )  PLACE ON TOP LEGEND LAYER. IF NO TOP LEGEND SUPPLIED,CREATE TOP LEGEND LAYER TO ADD. | (X)  REFER TO LAMINATION DIAGRAM FOR FINISHED COPPER WEIGHT/THICKNESS REQUIREMENTS. | ( )  ELECTRODEPOSITED HARD GOLD PLATE, TYPE 1 (99.7% MIN GOLD), GRADE C | (X)  APPLY SILKSCREEN USING A NON-CONDUCTIVE, WHITE EPOXY | OR OTHER DEFORMITIES THAT COULD EFFECT THE APPERANCE AND PERFORMACE OF THE CONTACT | SURFACE. CONTACTS ARE TO BE AS FLAT AS POSSIBLE. NOT TO EXCEED +/- 0.001" OF FLATNESS. | MINIMUM BARREL PLATING OF .001 IN. PLATED HOLES SHALL NOT BE ROUGH OR IRREGULAR | SO AS TO HINDER PROPER SOLDER WICKING. | USED AS VIA-IN PAD OR AS A STACKED VIA. BLIND/BURIED VIAS WITH AN ASPECT RATIO >1:1 TO BE FILLED | WITH NON-CONDUCTIVE EPOXY. UNLESS OTHERWISE SPECIFIED. | (X)  NON-CONDUCTIVE EPOXY. FILL AND CAP ALL 0.004 INCH DRILLED VIAS. | ( )  SILVER. FILL AND CAP ALL 0.XXXX INCH DRILLED VIAS. | (X)  DUPLICATE DRILL PRESENT AT 1 LOCATION. | ( )  SUPPLIER MAY ADD THIEVING TO COMPENSATE FOR LOW COPPER DENSITY AREAS ON THIS DESIGN. | (REQUIRED UNLESS OTHERWISE SPECIFIED IN QUOTE) | THE PCB SHALL HAVE A VERIFICATION STAMP. | OF COMPLIANCE SHALL BE PROVIDED BY VENDOR AT TIME OF SHIPMENT. | (X)  SUPPLIER MAY NOT ADD THIEVING TO COMPENSATE FOR LOW COPPER DENSITY AREAS ON THIS DESIGN. | ( )  PEMNUTS TO BE INSTALLED BY FABRICATOR.. | ( )  PEMNUTS NOT TO BE INSTALLED BY FABRICATOR. | (X)  NOT APPLICABLE. | WHERE SPACING PERMITS. | LEGEND TO LEGEND +/- 0.007 INCHES | ( )  FILLETED | (X)  NOT FILLETED | (X)  ISOLA 370HR OR EQUIVALENT | ( )  NELCO-4000-13 | ( )  MEGTRON 6 | ( )  ROGERS 4350B | ( )  ROGERS 4003C | ( )  ISOLA-FR408HR OR EQUIVALENT | WORKMANSHIP SHALL CONFORM TO IPC-A-600, CLASS 2, CURRENT REVISIONS. | WITH FLAMMABILITY RATING OF 94V-O. | AFTER ALL LAMINATION AND PLATING PROCESSES. IT IS TO BE MEASURED FROM | TOP PCB METAL TO BOTTOM PCB METAL UNLESS OTHERWISE SPECIFIED. | BOW & TWIST SHOULD BE MEASURED PER IPC-TM-650, METHOD 2.4.22. | DRILL LOCATION AND SIZE CONTROLLED BY EXCELLON CNC DRILL FILE. | THICKNESS AND TRACE WIDTHS TO MEET THE IMPEDANCE REQUIREMENT. IF SPECIFIED, VENDOR MUST FOLLOW AND | MEET THE REQUIREMENTS LISTED IN THE IMPEDANCE TABLE. ANY ADJUSTMENTS MADE TO THE DEFINED STACKUP, | TRACE WIDTH & SPACING THAT IMPACT THE REQUIREMENTS MUST HAVE WRITTEN APPROVAL FROM MAXIM. | UNLESS OTHERWISE SPECIFIED | (KNOOP HARDNESS 130-200), CLASS 1 (50-100 MICRO INCHES THICK) IN ACCORDANCE WITH MIL-G-45204C. | GENERAL SURFACING REQUIREMENTS MUST MEET ANSI/IPC-A-600(CURRENT REV) SECTION 4.0, | CLASS 3 (50-100 MICROINCHES THICK) OVER ELECTRODEPOSITED NICKEL PLATE | IN ACCORDANCE WITH ANSI/IPC-A-600D, SECTION 4.0, CLASS 3 (200-600 MICROINCHES THICK). | 100 MICRO INCHES MINIMUM OF ELECTROLESS NICKEL. | 118-236 MICRO INCHES MINIMUM OF ELECTROLESS NICKEL. | PER ARTWORK. | THE STARTING COPPER WEIGHT/THICKNESS CAN VARY AS LONG AS THE FINISHED COPPER | WEIGHT/THICKNESS IS NOT LESS THAN THE SPECIFIED VALUE. UNLESS OTHERWISE SPECIFIED. | BASED INK PER ARTWORK. | (USE CHECKED ITEMS FOR MATERIAL) | (USE CHECKED ITEMS FOR PLATING) | BLACK SOLDERMASK (BOTTOM SIDE ONLY) | (USE CHECKED ITEMS FOR TOOLING) | UNLESS OTHERWISE SPECIFIED: | SGB | 09/09/2019 | XX-XXXXX-XXX | FIDUCIAL | 0.025" RADIUS | OPEN SOLDERMASK | 0.050" RADIUS | DETAIL A [50x] | DETAIL B [10x] | DETAIL C [10x] | MAX86141_SPO2_1MM_APPS_P3
User.21: FIGURE | SIZE | 4.0 | 6.0 | 12.01 | TOLERANCE | +0.0/-4.0 | +3.0/-4.0 | +3.0/-3.0 | PLATED | ALL UNITS ARE IN MILS | QTY | 60 | 43 | 1 | NOTES | DRILL CHART: TOP to BOTTOM
